# Altium PCB PCB_Adaptor_Board-v2.0.PcbDoc (part 2 of 3)
Units mm, origin at the board's own origin, x right, y up, seen from the top; angles counter-clockwise.
Board outline 135 x 88.7 mm, 2 copper layers (Top Layer, Bottom Layer), stack 1.57 mm thick; 43 components, 95 nets, 382 pads, 142 vias.
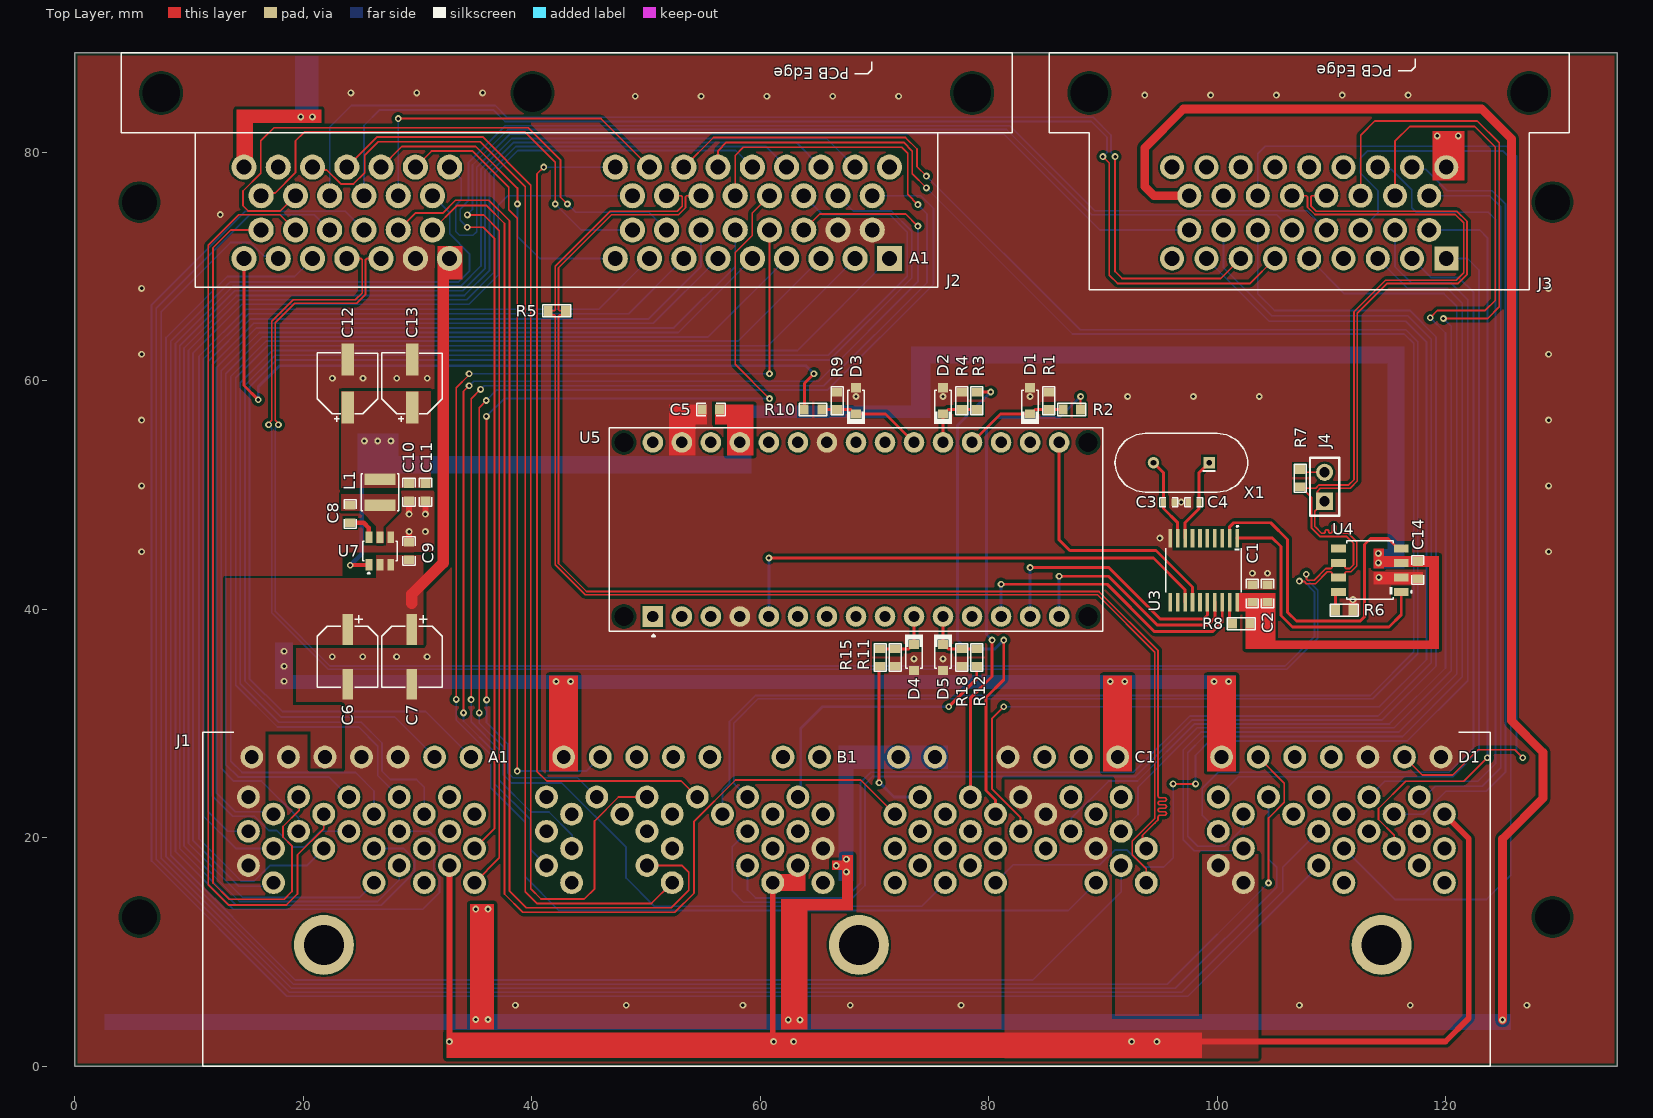
[diagram p0: Top Layer view]

## Via types
v1: diameter 0.6, hole 0.3, Top Layer to Bottom Layer, 142 vias

## Nets (pads, with @x,y where several pads share a name; then routed paths per layer and width w, separated by ;. In a path a pad name is that pad's centre, name@x,y a point inside that pad or via, vN(x,y) a via of type N, cw(c..) or ccw(c..) an arc to the next point about the centre after c; other vN are vias at no path point) (continued)
60H_A33/60H_C15: (continued)
  Top Layer w0.152: v1(28.301,82.956) 46.05,82.956 J2.A33@50.301,78.706
  Bottom Layer w0.152: J2.C15@28.301,76.206 v1(28.301,82.956)
135H_B6/60H_C21: J1.B6 J2.C21 | length 69.2
  Top Layer w0.152: J2.C21@29.801,78.706 31.209,80.114 34.813,80.114 37.977,76.95 37.977,74.985 38.725,74.237 v1@38.725,25.94
  Bottom Layer w0.152: v1(38.725,25.838) 44.756,25.838 J1.B6@45.985,27.067
135H_B9: J1.B9 R12.1 | length 24.4
  Top Layer w0.254: v1(76.501,31.471) 78.943,33.913 R12.1@78.943,35.019
  Bottom Layer w0.254: J1.B9@63.285,23.567 63.535,23.817 63.535,29.576 65.43,31.471 v1(76.501,31.471)
135H_B9_D8: D5.1 R12.2 R18.2 U5.11 | length 5.5
  Top Layer w0.254: D5.1@75.943,36.931 D5.1@75.993,36.931 U5.11@75.993,39.37 ; D5.1@76.043,36.931 76.431,36.543 R18.2@77.633,36.543 R12.2@78.943,36.543
135H_B13/60H_A34: J1.B13 J2.A34 | length 74.4
  Top Layer w0.152: v1(41.041,78.706) 40.441,78.105 40.441,25.823 41.296,24.968 53.083,24.968 J1.B13@54.485,23.567
  Bottom Layer w0.152: v1(41.041,78.706) J2.A34@47.301,78.706
135H_B15/60H_C23: J1.B15 J2.C23 | length 98.3
  Top Layer w0.152: J2.C23@23.801,78.706 26.449,81.353 35.686,81.353 39.907,77.132 39.907,15.533 40.802,14.638 44.591,14.638 45.491,15.539 45.491,21.473 47.585,23.567 J1.B15@50.085,23.567
135H_B17/60H_A21: J1.B17 J2.A21 | length 86.3
  Top Layer w0.152: v1(36.022,56.888) 36.022,56.877 36.038,56.862 v1(36.038,32.073) ; v1(60.801,58.445) 57.801,61.445 57.801,71.231 59.29,72.721 59.29,74.695 J2.A21@60.801,76.206
  Bottom Layer w0.152: v1(36.022,56.888) 37.58,58.445 v1(60.801,58.445) ; v1(36.038,32.073) 36.038,30.077 37.904,28.211 37.904,25.701 38.347,25.259 43.993,25.259 J1.B17@45.685,23.567
135H_B32/60H_C24: J1.B32 J2.C24 | length 99
  Top Layer w0.152: J2.C24@20.801,78.706 21.046,78.461 22.04,78.461 23.262,77.239 24.387,77.239 25.376,78.228 25.376,79.737 26.564,80.925 35.468,80.925 39.418,76.975 39.418,15.27 40.432,14.255 50.474,14.255 J1.B32@52.285,16.067
135H_B33/C9: J1.B33 J2.C9 | length 92.7
  Top Layer w0.152: J2.C9@28.301,73.206 29.783,74.687 32.187,74.687 33.315,75.815 36.232,75.815 38.05,73.997 38.05,15.316 39.493,13.872 52.206,13.872 53.737,15.403 53.737,16.988 53.158,17.567 J1.B33@50.085,17.567
135H_C12: J1.C12 R3.1 | length 45.1
  Top Layer w0.254: R3.1@78.943,59.011 78.956,59.024 v1(80.173,59.024) ; J1.C12@80.585,22.067 80.585,23.304 79.756,24.133 79.756,32.283 81.305,33.833 v1(81.305,37.305)
  Bottom Layer w0.254: v1(80.173,59.024) 77.266,56.117 77.266,37.305 78.028,36.543 80.543,36.543 v1(81.305,37.305)
135H_C12_A1: D2.1 R3.2 R4.2 U5.20 | length 5.6
  Top Layer w0.254: U5.20@75.993,54.61 75.993,57.049 76.431,57.487 R4.2@77.633,57.487 R3.2@78.943,57.487
135H_C13: J1.C13 R2.1 | length 43.8
  Top Layer w0.152: R2.1@88.036,57.487 v1(88.036,58.63)
  Top Layer w0.254: J1.C13@78.385,23.567 78.385,32.208 80.289,34.112 v1(80.289,37.305)
  Bottom Layer w0.254: v1(80.289,37.305) 79.799,37.795 79.799,55.884 80.708,56.793 86.199,56.793 v1(88.036,58.63)
135H_C13_A0: D1.1 R1.1 R2.2 U5.19 | length 9.2
  Top Layer w0.254: U5.19@78.533,54.61 81.022,57.099 D1.1@83.613,57.099 83.663,57.099 84.051,57.487 R1.1@85.253,57.487 R2.2@86.512,57.487
135H_C15: J1.C15 R11.1 | length 14.4
  Top Layer w0.254: v1(70.401,24.817) R11.1@70.401,35.066
  Bottom Layer w0.254: v1(70.401,24.817) 70.447,24.817 71.698,23.567 J1.C15@73.985,23.567
135H_C15_D7: D4.1 R11.2 R15.1 U5.10 | length 5.5
  Top Layer w0.254: R11.2@70.503,36.543 73.015,36.543 D4.1@73.403,36.931 ; D4.1@73.453,36.931 73.453,37.081 U5.10@73.453,39.37
135H_C18/60H_B20: J1.C18 J3.B20 | length 105.6
  Top Layer w0.152: J3.B20@112.551,76.206 112.551,81.499 113.798,82.746 122.767,82.746 124.686,80.827 124.686,66.473 123.674,65.46 v1(119.797,65.46)
  Bottom Layer w0.152: J1.C18@91.585,20.567 93.06,22.042 93.06,24.431 98.25,29.621 115.471,29.621 120.476,34.625 120.476,64.781 v1(119.797,65.46)
135H_C29/C14: J1.C29 J2.C14 | length 174.8
  Bottom Layer w0.152: J2.C14@31.301,76.206 32.801,74.706 32.801,72.867 34.534,71.134 34.534,69.606 33.591,68.663 13.588,68.663 8.398,63.473 8.398,18.454 19.299,7.553 83.854,7.553 91.585,15.283 J1.C29@91.585,17.567
135H_D6/C5: J1.D6 J2.C5 | length 178.5
  Top Layer w0.152: J1.D6@103.585,27.067 105.871,24.78 105.871,23.108 104.485,21.721 v1(104.485,16.043)
  Bottom Layer w0.152: J2.C5@20.801,70.706 19.234,69.139 13.326,69.139 7.979,63.792 7.979,18.331 19.128,7.182 95.624,7.182 v1(104.485,16.043)
135H_D9/34H_B18: J1.D9 J3.B18 | length 64
  Bottom Layer w0.152: J1.D9@117.685,23.567 118.145,23.567 119.085,24.506 123.187,24.506 124.809,26.128 124.809,75.233 123.837,76.206 J3.B18@118.551,76.206
135H_D15/C6: J1.D15 J2.C6 | length 175.4
  Bottom Layer w0.152: J2.C6@17.801,70.706 17.585,70.921 16.561,70.921 15.381,72.102 13.622,72.102 7.554,66.034 7.554,18.216 18.954,6.816 96.339,6.816 105.203,15.681 105.203,17.409 104.485,18.128 J1.D15@104.485,23.567
(A16)/C18: J2.A16 J2.C18 | length 53.3
  Top Layer w0.152: J2.C18@19.301,76.206 17.968,74.873 15.158,74.873 14.71,75.321 14.71,76.617 16.276,78.183 16.276,81.015 17.426,82.164 39.678,82.164 42.5,79.342 42.5,76.093 v1(43.113,75.481)
  Bottom Layer w0.152: v1(43.113,75.481) 43.844,74.75 50.256,74.75 J2.A16@51.801,73.206
(A17)/C19: J2.A17 J2.C19 | length 42.1
  Top Layer w0.152: J2.C19@16.301,76.206 16.543,76.447 17.54,76.447 19.299,78.206 19.299,80.995 20.079,81.774 39.418,81.774 42.043,79.148 v1(42.043,75.481)
  Bottom Layer w0.152: v1(42.043,75.481) 44.319,73.206 J2.A17@48.801,73.206
(B6)/C16: J2.C16 J3.B6 | length 100.9
  Top Layer w0.152: v1(89.992,79.629) 90.551,79.07 90.551,69.24 91.262,68.529 102.874,68.529 J3.B6@105.051,70.706
  Bottom Layer w0.152: J2.C16@25.301,76.206 25.301,82.349 26.67,83.718 36.625,83.718 37.645,82.699 88.98,82.699 90.352,81.327 90.352,79.989 v1(89.992,79.629)
(B7)/C17: J2.C17 J3.B7 | length 100.3
  Top Layer w0.152: v1(91.059,79.629) 91.059,69.571 91.669,68.961 100.306,68.961 J3.B7@102.051,70.706
  Bottom Layer w0.152: J2.C17@22.301,76.206 22.301,82.218 24.182,84.099 36.783,84.099 37.803,83.08 89.138,83.08 90.703,81.514 90.703,79.985 v1(91.059,79.629)
A1/A19: J1.A1 J2.A19 | length 121.5
  Bottom Layer w0.152: J1.A1@34.685,27.067 30.69,31.061 18.146,31.061 15.274,33.934 15.274,59.438 17.668,61.832 66.09,61.832 73.255,68.998 73.255,73.104 71.488,74.872 68.134,74.872 J2.A19@66.801,76.206
A2/A20: J1.A2 J2.A20 | length 121.4
  Bottom Layer w0.152: J1.A2@31.485,27.067 27.97,30.582 18.007,30.582 14.885,33.704 14.885,59.6 17.533,62.248 65.955,62.248 72.866,69.159 72.866,73.021 71.35,74.537 65.469,74.537 J2.A20@63.801,76.206
A10/A1: J1.A10 J2.A1 | length 111.4
  Bottom Layer w0.152: J1.A10@30.585,22.067 30.585,24.415 29.895,25.106 27.594,25.106 26.88,25.82 26.88,28.293 25.052,30.121 17.829,30.121 14.466,33.484 14.466,59.84 17.274,62.647 63.242,62.647 J2.A1@71.301,70.706
A11/A2: J1.A11 J2.A2 | length 105.3
  Bottom Layer w0.152: J1.A11@28.385,23.567 26.498,25.454 26.498,28.028 24.833,29.693 17.729,29.693 14.069,33.353 14.069,60.26 16.886,63.078 60.673,63.078 J2.A2@68.301,70.706
A12/A3: J1.A12 J2.A3 | length 105.3
  Bottom Layer w0.152: J1.A12@26.185,22.067 26.185,24.096 24.572,25.71 14.633,25.71 13.646,26.697 13.646,60.381 16.749,63.484 58.079,63.484 J2.A3@65.301,70.706
A13/A4: J1.A13 J2.A4 | length 99.5
  Bottom Layer w0.152: J1.A13@23.985,23.567 22.226,25.326 14.285,25.326 13.204,26.407 13.204,60.633 16.417,63.846 55.441,63.846 J2.A4@62.301,70.706
A14/C12: J1.A14 J2.C12 | length 82.2
  Top Layer w0.152: J2.C12@19.301,73.206 17.956,74.551 14.344,74.551 11.662,71.869 11.662,15.88 13.419,14.123 18.521,14.123 19.484,15.087 19.484,18.504 21.785,20.804 J1.A14@21.785,22.067
A15/C13: J1.A15 J2.C13 | length 77.4
  Top Layer w0.152: J2.C13@16.301,73.206 13.649,73.206 12.091,71.648 12.091,16.04 13.503,14.628 18.321,14.628 18.993,15.3 18.993,19.288 18.215,20.065 18.215,20.991 19.64,22.416 19.64,23.512 J1.A15@19.585,23.567
A16/A14: J1.A16 J2.A14 | length 95.3
  Bottom Layer w0.152: J1.A16@17.385,22.067 17.164,22.287 14.048,22.287 12.385,23.95 12.385,61.13 15.891,64.636 52.433,64.636 57.801,70.004 J2.A14@57.801,73.206
A18/B13: J1.A18 J3.B13 | length 143.6
  Top Layer w0.152: v1@34.087,73.444 v1(34.341,73.444) 35.757,73.444 36.72,72.481 36.72,20.802 J1.A18@34.985,19.067
  Bottom Layer w0.152: v1(34.341,73.444) 33.721,74.064 33.721,75.035 34.444,75.758 34.444,79.1 37.671,82.328 81.841,82.328 89.267,74.902 107.855,74.902 J3.B13@109.551,73.206
A21/A27: J1.A21 J2.A27 | length 152
  Bottom Layer w0.152: J1.A21@28.385,20.567 30.983,20.567 31.902,19.648 31.902,18.514 31.416,18.028 31.416,17.093 31.924,16.585 31.924,15.236 30.438,13.75 13.866,13.75 8.793,18.822 8.793,63.252 13.838,68.297 33.784,68.297 35.54,70.053 35.54,78.526 38.232,81.217 65.789,81.217 J2.A27@68.301,78.706
A22/A28: J1.A22 J2.A28 | length 142.2
  Bottom Layer w0.152: J1.A22@26.185,19.067 28.725,19.067 29.733,18.059 29.733,17.024 26.801,14.092 14.137,14.092 9.17,19.059 9.17,63.069 13.996,67.895 33.947,67.895 35.905,69.853 35.905,78.368 38.409,80.872 63.135,80.872 J2.A28@65.301,78.706
A23/A6: J1.A23 J2.A6 | length 100.3
  Bottom Layer w0.152: J1.A23@23.985,20.567 21.455,20.567 20.085,19.196 19.109,19.196 17.67,20.636 16.979,20.636 15.723,21.892 13.811,21.892 12.02,23.682 12.02,61.418 15.64,65.038 50.634,65.038 J2.A6@56.301,70.706
A24/A8: J1.A24 J2.A8 | length 98.9
  Bottom Layer w0.152: J1.A24@21.785,19.067 20.285,17.567 17.05,17.567 15.701,16.217 14.545,16.217 10.86,19.902 10.86,62.145 14.985,66.27 45.865,66.27 J2.A8@50.301,70.706